# Altium PCB EEM_FMC_Carrier.PcbDoc (part 15 of 19)
Units mm, origin at the board's own origin, x right, y up, seen from the top; angles counter-clockwise.
Board outline 222.9 x 100 mm, 6 copper layers (TopLayer, MidLayer1, MidLayer2, SignalLayer1, Internal Plane 1, BottomLayer), stack 1.528 mm thick; 790 components, 743 nets, 3570 pads, 2277 vias.
Unrouted connection lines stored in the file: 3.
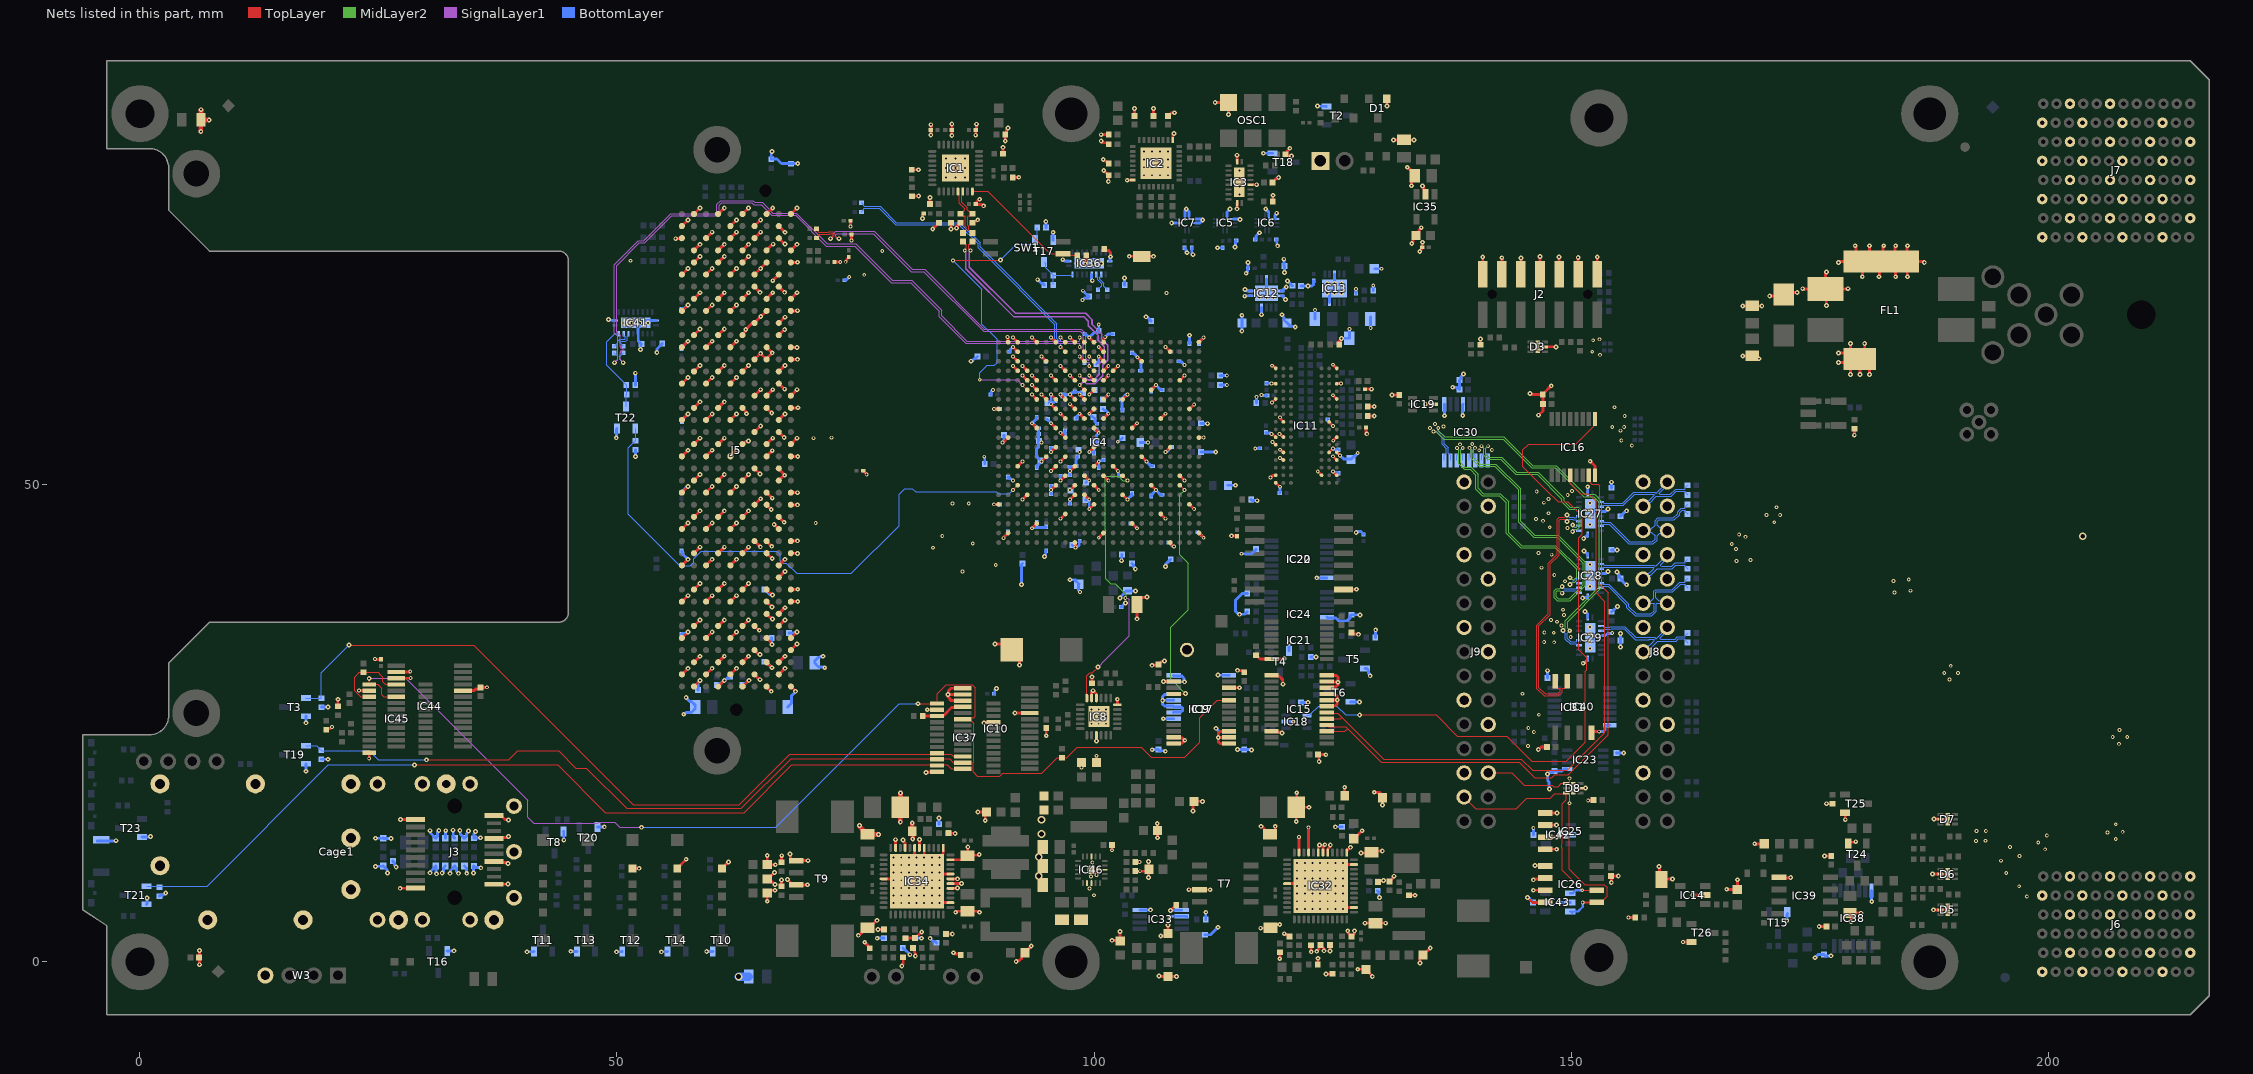
[diagram p17: the nets of this part, all layers, seen from the top]

## Via types
v1: diameter 0.4, hole 0.2, TopLayer to BottomLayer, tented both sides, 1032 vias
v2: diameter 0.5, hole 0.2, TopLayer to BottomLayer, tented both sides, 979 vias
v3: diameter 0.5, hole 0.2, TopLayer to BottomLayer, 162 vias
v4: diameter 0.8, hole 0.5, TopLayer to BottomLayer, tented both sides, 102 vias
v5: diameter 0.6, hole 0.3, TopLayer to BottomLayer, tented both sides, 2 vias

## Nets (pads, with @x,y where several pads share a name; then routed paths per layer and width w, separated by ;. In a path a pad name is that pad's centre, name@x,y a point inside that pad or via, vN(x,y) a via of type N, cw(c..) or ccw(c..) an arc to the next point about the centre after c; other vN are vias at no path point) (continued)
GND: (continued)
  BottomLayer w0.3: SW2.2@-4.475,12.675 -2.55,12.675 v2(-2.525,12.7) ; T23.2@0.225,13.075 0.25,13.1 1.075,13.1 v2(1.1,13.125) ; T21.2@0.7,6.025 0.725,6.05 v2(0.725,6.7) ; R255.1@2.025,6.88 2.165,7.02 2.466,7.02 2.646,7.2 v2(2.7,7.2) ; v2(17.398,19.975) T19.2@17.398,20.75 ; v2(17.398,25.05) T3.2@17.398,25.75 ; R227.1@18.998,21.23 v2(19.703,21.23) ; R45.1@19.025,26.705 v2(19.72,26.705) ; v2(24.675,10) 24.695,10.02 25.48,10.02 C192.1@25.5,10.04 25.505,10.04 25.912,9.633 25.912,9.338 v2(25.95,9.3) ; v2(24.675,12.95) 24.68,12.955 25.495,12.955 C42.1@25.5,12.96 25.517,12.943 26.307,12.943 v2(26.325,12.925) ; C299.2@26.5,10.55 26.66,10.39 26.66,10.169 26.85,9.979 v2(26.85,9.925) ; v2(30.4,9.325) 30.438,9.363 30.438,9.483 30.995,10.04 C19.1@31,10.04 31.038,10.002 31.038,9.262 v2(31.075,9.225) ; v2(30.4,13.75) 30.438,13.712 30.438,13.517 30.995,12.96 C301.1@31,12.96 31.19,13.15 31.19,13.586 31.325,13.721 v2(31.325,13.775) ; v2(31.675,9.3) 31.675,9.354 31.81,9.489 31.81,9.85 C17.1@32,10.04 ; C302.1@32,12.96 32.025,12.985 32.025,13.725 v2(32.05,13.75) ; T16.2@32.2,1.15 v2(32.925,1.15) ; v2(32.5,9.275) 32.538,9.313 32.538,9.583 32.995,10.04 C14.1@33,10.04 33.19,9.85 33.19,9.499 33.4,9.289 v2(33.4,9.275) ; v2(32.8,13.8) 32.838,13.762 32.838,13.122 C303.1@33,12.96 ; v2(33.525,13.775) 33.563,13.737 33.563,13.392 33.995,12.96 C321.1@34,12.96 34.005,12.96 34.21,13.165 34.21,13.456 34.425,13.671 v2(34.425,13.725) ; C18.1@34,10.04 34.005,10.04 34.21,9.835 34.21,9.369 34.25,9.329 v2(34.25,9.275) ; v2(34.95,9.3) 34.975,9.325 34.975,10.025 C20.2@35,10.05 35.16,9.89 35.631,9.89 35.671,9.85 v2(35.725,9.85) ; v2(35.175,13.65) 35.175,13.596 35,13.421 C322.2@35,12.95 35.025,12.975 35.675,12.975 v2(35.7,13) ; v2(40.575,1.05) 41.25,1.05 T11.2@41.3,1.1 ; T8.2@44.4,13.675 44.412,13.662 44.412,12.762 v2(44.425,12.75) ; v2(45.15,1.1) T13.2@45.8,1.1 ; T20.2@47.95,14.15 v2(48.675,14.15) ; v2(49.1,67.325) 49.154,67.325 49.229,67.25 49.775,67.25 IC41.11@49.8,67.225 ; v2(49.925,54.925) 49.963,54.963 49.963,55.863 T22.2@50,55.9 ; v2(49.95,1.05) 50.5,1.05 T12.2@50.55,1.1 ; R118.1@51.92,60.45 51.922,60.453 51.922,61.698 v2(51.925,61.7) ; v2(51.95,52.975) R284.1@51.95,53.68 ; v2(52.45,64.175) 52.488,64.213 52.488,64.713 C300.1@52.55,64.775 52.225,65.1 52.225,65.8 IC41.5@52.2,65.825 52.2,66.725 IC41.21@51.95,66.975 52.2,67.225 IC41.20@54.1,67.225 ; v2(54.172,63.866) 54.21,63.904 54.21,64.245 54.745,64.78 R117.2@54.745,64.8 ; v2(54.65,1.05) 55.25,1.05 T14.2@55.3,1.1 ; C297.1@56.773,34.35 56.773,34.372 56.823,34.422 57.236,34.422 57.384,34.57 v2(57.438,34.57) ; C296.1@56.773,43.075 56.823,43.025 56.823,42.805 v2(57.438,42.19) ; C291.1@56.773,49.225 56.773,49.25 56.823,49.3 56.848,49.3 57.32,49.772 57.4,49.772 v2(57.438,49.81) ; C292.1@56.773,64.225 56.823,64.275 56.823,64.435 v2(57.438,65.05) ; C294.1@56.773,68.4 56.773,68.425 56.823,68.475 57.053,68.475 v2(57.438,68.86) ; C295.1@56.798,56.575 56.848,56.625 56.848,56.84 v2(57.438,57.43) ; v2(56.998,25.95) 57.052,25.95 57.252,26.15 57.622,26.15 57.798,26.15 58.198,26.55 C197.2@58.198,26.725 58.198,26.9 57.798,27.3 57.623,27.3 57.248,27.675 v2(57.248,27.7) ; C198.2@58.473,28.5 58.473,29.222 58.708,29.457 v2(58.708,29.49) ; v2(59.4,1.075) 60.025,1.075 T10.2@60.05,1.1 ; C206.1@60.498,29 60.658,29.16 60.864,29.16 v2@61.194,29.49 ; v2@61.302,29.49 61.552,29.74 61.713,29.74 C195.1@61.873,29.9 ; C196.1@63.173,29 63.333,29.16 63.43,29.16 v2@63.772,29.502 ; C207.1@65.448,31.45 65.608,31.29 65.783,31.29 v2(66.248,30.825) ; C203.1@65.448,39.025 65.985,38.488 v2@66.26,38.488 ; R259.1@66.173,84.145 66.173,84.875 v2(66.248,84.95) ; C209.2@66.198,33.95 66.223,33.925 v2@66.223,33.3 ; R259.1@66.287,84.161 66.757,84.161 67.088,83.83 67.088,83.81 67.228,83.67 R124.1@68.248,83.67 v2(68.943,83.67) ; C208.2@67.898,26.7 68.298,27.1 68.298,27.896 v2@68.698,28.296 ; C205.2@68.048,34.475 68.719,34.475 v2@68.814,34.57 ; v2(71.598,32.025) 71.56,31.987 71.36,31.987 71.298,31.925 71.123,31.925 70.723,31.525 C204.2@70.723,31.35 70.723,31.309 71.123,30.909 71.635,30.909 71.719,30.825 v2(71.773,30.825) ; C194.1@73.848,71.45 73.898,71.5 74.073,71.5 v1(74.348,71.775) ; v2(77.273,2.475) 77.276,2.478 77.996,2.478 R221.1@77.998,2.48 ; R244.1@79.968,1.45 79.968,1.43 80.108,1.29 80.158,1.29 v2(80.698,0.75) ; C284.1@81.248,2.5 81.261,2.488 81.91,2.488 v2(81.923,2.475) ; v2(82.826,2.461) 82.826,2.447 83.153,2.12 83.358,2.12 R231.1@83.498,1.98 ; R235.1@83.748,14.42 v2(83.748,15.075) ; v2(87.098,62.958) 87.136,62.996 87.244,62.996 87.538,63.29 87.638,63.29 C130.1@87.798,63.45 ; v1(88.498,52.95) 88.498,52.923 88.548,52.873 C131.1@88.548,52.2 ; C127.1@89.148,59.45 89.173,59.45 89.223,59.5 89.223,59.748 89.398,59.923 v1(89.398,59.95) ; v1(89.498,47.956) 89.504,47.95 C64.1@90.148,47.95 ; v1(89.498,57.95) C122.1@90.148,57.95 ; C111.1@89.525,28.1 89.55,28.1 89.6,28.15 89.6,28.471 v2@89.779,28.65 ; v1(90.423,54.425) 90.423,54.452 90.548,54.577 C121.1@90.548,55.2 ; v1(90.498,44.407) 90.517,44.426 90.517,44.469 90.948,44.9 90.948,45.05 C141.1@90.998,45.1 ; C133.1@91.048,50.85 C133.1@90.998,50.8 90.998,50.775 91.048,50.725 91.196,50.725 v1@91.471,50.45 ; C168.1@91.148,63.95 91.173,63.95 91.223,64 91.223,64.175 v1(91.498,64.45) ; v2(92.4,39.556) 92.4,41.652 C116.1@92.498,41.75 ; v1(93.498,45.45) 93.525,45.45 93.6,45.525 94.948,45.525 94.998,45.575 C65.1@94.998,45.6 ; 93.998,45.6 C144.1@93.998,46.1 ; C132.1@93.998,51.8 94.048,51.85 94.048,52 v1(94.498,52.45) 93.98,52.968 93.98,53.741 94.163,53.924 94.163,55.935 93.667,56.431 93.517,56.431 v1(93.498,56.45) 93.948,56.9 93.948,57.05 C143.1@93.998,57.1 ; v2(94.098,71.5) 94.488,71.11 94.638,71.11 94.778,70.97 R252.1@94.778,70.95 ; v1(94.498,63.45) 94.948,63 94.948,62.85 C172.1@94.998,62.8 ; v2(94.798,42.475) 94.798,42.529 94.948,42.679 94.948,43.05 C123.1@94.998,43.1 ; v2(94.948,77.6) 94.958,77.59 94.958,76.96 R253.1@94.968,76.95 ; C315.1@95.1,56.848 v1@95.479,56.469 ; v1(95.498,53.45) 95.504,53.456 95.504,53.893 C150.1@95.51,53.899 ; v1(95.498,58.45) 95.479,58.469 95.41,58.469 95.324,58.555 C312.1@95.324,58.624 ; v1(95.498,59.45) 95.517,59.431 95.517,58.8 95.5,58.8 C312.1@95.324,58.624 ; C316.1@95.5,49.925 95.5,49.452 v1(95.498,49.45) 95.517,49.431 95.517,49.058 C319.1@95.55,49.025 ; T17.2@95.715,75.635 95.719,75.639 95.719,76.471 v2(95.723,76.475) ; C152.1@95.998,58.8 95.998,58.775 95.948,58.725 95.923,58.725 95.822,58.624 C312.1@95.324,58.624 ; C151.1@96.489,50.952 96.493,50.948 96.493,50.455 v1(96.498,50.451) ; v1(96.498,55.45) 96.517,55.431 96.944,55.431 ; v2(96.723,73.6) 96.777,73.6 96.927,73.45 IC36.11@97.348,73.45 ; C308.1@96.725,59.45 v1(97.498,59.45) 97.525,59.45 97.775,59.7 97.925,59.7 C146.1@97.975,59.75 ; C317.1@96.952,55.138 96.944,55.146 96.944,55.431 ; C149.1@96.952,55.682 96.944,55.674 96.944,55.431 ; C318.1@97.45,51.9 97.479,51.871 97.479,51.469 v1(97.498,51.45) 97.494,51.446 97.494,51.007 C148.1@97.491,51.003 ; v2(97.473,40.05) 98.048,40.05 98.073,40.025 98.073,39.95 L4.1@98.423,39.6 98.365,39.542 98.365,38.908 v1(98.523,38.75) ; C147.1@97.491,48.006 97.494,48.01 97.494,48.446 v1(97.498,48.45) ; C318.1@97.5,51.95 R83.1@98.148,51.95 ; C309.1@97.725,43.7 97.986,43.439 98.029,43.439 v1(98.048,43.42) 98.067,43.439 98.182,43.439 98.448,43.705 98.448,44.05 C118.1@98.498,44.1 ; C146.1@97.975,59.775 C146.1@97.975,59.75 ; C112.1@98.148,56.95 98.173,56.95 98.223,57 98.223,57.224 98.43,57.431 98.479,57.431 v1(98.498,57.45) ; R83.1@98.168,51.95 R83.1@98.148,51.95 ; R84.1@98.303,52.95 98.283,52.95 98.223,52.89 98.223,52.722 98.108,52.607 98.108,52.027 98.148,51.987 R83.1@98.148,51.95 ; v1(98.498,63.45) 98.948,63 98.948,62.85 C170.1@98.998,62.8 ; C313.1@98.7,59.6 98.55,59.45 98.55,59.69 98.54,59.7 98.025,59.7 C146.1@97.975,59.75 ; v1(98.798,69.375) 98.809,69.375 99.024,69.59 99.338,69.59 C287.1@99.498,69.75 99.338,69.91 99.265,69.91 v1(98.825,70.35) ; C169.1@98.998,65.8 98.998,65.775 99.048,65.725 99.223,65.725 v1(99.498,65.45) 100.038,65.99 100.338,65.99 C156.1@100.498,66.15 v1(100.498,66.819) ; C105.1@99.125,48.4 99.498,48.4 v1@99.498,47.472 ; C109.1@99.15,50.25 99.31,50.41 99.431,50.41 99.471,50.45 v1(99.498,50.45) ; v1(99.498,53.45) v1@99.525,53.45 ; v1(99.498,57.45) 99.838,57.11 99.888,57.11 100.048,56.95 100.075,56.95 100.11,56.915 100.11,56.615 C161.1@100.325,56.4 ; v1(99.498,59.45) 99.838,59.79 99.888,59.79 C163.1@100.048,59.95 ; v1(99.498,61.45) 99.948,61 100.098,61 C102.1@100.148,60.95 ; IC36.5@99.748,72.05 99.748,71.529 99.823,71.454 v2(99.823,71.4) ; C113.1@99.948,53.45 v1@99.525,53.45 ; C113.1@99.998,53.3 C113.1@99.998,53.325 ; C320.1@100.225,55.85 100.25,55.85 100.479,55.621 100.479,55.469 v1(100.498,55.45) 100.247,55.199 100.247,54.499 C153.1@100.198,54.45 99.998,54.25 C113.1@99.998,53.325 ; C99.1@100.248,62.65 100.498,62.9 v1(100.498,63.45) ; C157.1@100.498,51.798 v1(100.498,52.45) 100.525,52.45 100.6,52.525 100.948,52.525 100.998,52.575 C158.1@100.998,52.6 ; C106.1@100.948,57.95 101.108,57.79 101.272,57.79 101.479,57.583 101.479,57.469 v1(101.498,57.45) ; C104.1@100.948,58.95 101.108,59.11 101.158,59.11 v1(101.498,59.45) ; v1(101.173,65.475) 101.498,65.8 C129.1@101.998,65.8 ; IC36.20@101.648,73.45 101.66,73.45 101.685,73.475 101.685,73.863 v2(101.722,73.9) ; v1(102.487,54.518) 102.506,54.537 102.56,54.537 102.763,54.74 102.838,54.74 C178.1@102.998,54.9 ; v1(102.498,51.45) 102.498,51.423 102.573,51.348 102.573,51 102.623,50.95 C160.1@102.648,50.95 ; v2(102.725,38.125) 102.763,38.163 102.763,38.24 103.423,38.9 C164.1@103.498,38.9 103.51,38.888 104.336,38.888 v2(104.348,38.875) ; C173.1@102.848,37.2 102.873,37.2 102.923,37.25 102.923,37.275 103.207,37.559 103.265,37.559 v2(103.304,37.597) ; C159.1@102.848,58.95 C159.1@102.873,58.95 ; v2(102.873,42.05) 102.91,42.087 102.91,42.663 C162.1@102.948,42.7 ; C138.1@102.998,57.8 102.948,57.85 102.948,58.04 102.937,58.051 102.937,58.632 102.923,58.646 102.923,58.9 C159.1@102.873,58.95 ; v2(103.198,71.675) 103.208,71.665 103.208,70.96 R254.2@103.218,70.95 ; v1(103.498,48.45) 103.948,48.9 103.948,49.05 C288.1@103.998,49.1 ; v1(103.498,59.45) 103.479,59.431 103.329,59.431 102.923,59.025 102.923,59 C159.1@102.873,58.95 ; C134.1@103.848,45.95 103.898,45.9 104.048,45.9 v1(104.498,45.45) ; C45.1@103.974,63.811 103.974,63.786 104.024,63.736 104.212,63.736 v1(104.573,63.375) 104.937,63.011 104.937,62.268 104.923,62.254 104.923,62 104.873,61.95 C128.1@104.848,61.95 ; C120.1@103.998,41.75 104.158,41.59 104.158,41.397 104.333,41.222 v2(104.333,41.177) ; IC33.4@104.81,5.438 v2@105.911,5.438 ; C101.1@104.848,54.45 v1(105.648,54.45) ; v2(105.452,67.609) 105.506,67.609 105.611,67.504 105.644,67.504 C125.1@105.998,67.15 ; v1(105.496,52.458) 105.496,52.452 105.948,52 106.098,52 C183.1@106.148,51.95 ; C119.1@105.998,48.8 106.048,48.85 106.048,49 v1(106.498,49.45) 106.948,49 107.098,49 C289.1@107.148,48.95 ; C139.1@105.998,59.8 106.048,59.85 106.048,60 v1(106.498,60.45) 106.948,60 107.098,60 C137.1@107.148,59.95 ; v2(106.098,22.225) 106.111,22.238 106.735,22.238 C67.1@106.748,22.25 106.872,22.126 107.368,22.126 107.419,22.075 v2(107.473,22.075) ; v2(107.259,25.475) IC17.5@108.348,25.475 ; v2(107.49,41.45) 107.529,41.488 107.529,41.681 C177.1@108.048,42.2 ; v1(107.499,53.449) 107.518,53.468 107.641,53.468 108.073,53.9 108.098,53.9 C140.1@108.148,53.95 ; C117.1@107.848,43.95 107.873,43.95 107.923,43.9 107.923,43.832 108.21,43.544 108.354,43.544 v1(108.373,43.525) ; v2(108.025,5.375) 108.05,5.4 IC33.5@109.173,5.4 ; v2@108.077,4.775 IC33.6@109.198,4.775 ; v2(108.143,77.45) IC7.9@108.848,77.45 ; IC17.6@108.348,26.125 108.423,26.2 109.122,26.2 109.298,26.376 109.298,26.575 109.173,26.7 108.423,26.7 IC17.7@108.348,26.775 108.305,26.818 107.38,26.818 107.198,27 v2(107.198,27.4) ; IC17.8@108.348,27.425 108.335,27.413 107.211,27.413 v2(107.198,27.4) ; IC17.9@108.348,28.075 108.28,28.007 107.405,28.007 107.198,27.8 v2(107.198,27.4) ; IC17.11@108.348,29.375 108.36,29.363 v2@109.46,29.363 ; IC17.12@108.348,30.025 108.423,29.95 109.198,29.95 109.347,29.801 109.441,29.707 109.441,29.382 v2@109.46,29.363 ; C142.1@108.848,62.95 108.898,62.9 109.148,62.9 v1(109.498,62.55) ; v2@109.473,29.296 v2(109.473,29.35) v2@109.46,29.363 ; C51.1@109.498,74.85 109.548,74.8 109.548,74.775 109.648,74.675 109.648,74.479 109.748,74.379 v2(109.748,74.325) ; IC7.1@109.548,78.1 109.548,78.775 v2(109.673,78.9) 109.948,78.624 IC7.2@109.948,78.15 ; IC33.6@109.72,4.7 109.645,4.775 IC33.6@109.198,4.775 ; IC33.6@109.72,4.775 IC33.6@109.198,4.775 ; C41.1@109.998,64.8 v2(109.998,65.675) ; C48.1@110.248,74.85 110.249,74.849 110.249,74.303 110.373,74.179 v2(110.373,74.125) ; IC7.4@110.648,77.45 111.122,77.45 111.398,77.726 v2(111.398,77.75) 111.298,77.85 IC7.3@110.648,77.85 ; C182.1@110.848,45.025 110.898,44.975 110.973,44.975 v1(111.498,44.45) ; C124.1@110.998,64.8 111.048,64.85 111.048,65 v1(111.498,65.45) ; C136.1@111.198,53.45 112.741,53.45 v2(112.761,53.43) ; C135.1@111.198,56.45 111.218,56.43 111.88,56.43 v2(111.9,56.41) ; C245.1@111.633,2.835 111.642,2.844 112.217,2.844 v2(112.998,3.625) ; R194.1@111.718,4.45 111.718,5.193 v2(111.725,5.2) ; v2(112.798,24.475) 113.098,24.175 IC17.22@114.148,24.175 ; v2(112.948,74.85) C49.1@113.498,74.85 ; v2(112.998,30.05) 113.011,30.038 114.135,30.038 IC17.13@114.148,30.025 ; C126.1@113.198,60.45 v1(113.923,60.45) ; C115.1@113.198,61.45 v1(113.923,61.45) ; IC5.2@113.948,78.15 113.948,78.6 v2(114.248,78.9) ; C175.1@114.048,49.95 v2(114.823,49.95) ; IC5.3@114.648,77.85 115.26,77.85 v2(115.296,77.814) v2@115.332,77.85 ; v2(114.773,74.939) 114.773,74.993 114.823,75.043 114.823,75.55 114.873,75.6 C46.1@114.898,75.6 ; v2(115.048,22.25) C66.1@115.748,22.25 116.448,22.25 v2(116.498,22.2) ; v1(115.448,42.775) 116.523,42.775 C191.1@116.998,43.25 ; v2(115.498,66.125) C90.1@115.498,66.95 v2(115.498,67.775) ; v2(115.798,69.775) 115.852,69.775 115.9,69.823 IC12.11@116.52,69.823 ; v2(115.823,70.475) 115.877,70.475 116.029,70.323 IC12.11@116.52,70.323 ; v2(115.948,72.175) 115.948,72.229 116.073,72.354 116.073,72.65 116.123,72.7 C93.1@116.148,72.7 v2(116.148,73.3) ; R104.2@116.055,36.7 116.055,36.68 115.84,36.465 115.792,36.465 115.752,36.425 115.175,36.425 114.813,36.787 114.813,37.863 115.575,38.625 R110.2@116.08,38.625 ; R36.1@116.468,48.475 116.569,48.374 117.067,48.374 v2(117.106,48.336) ; v1(116.898,53.8) 116.911,53.813 117.386,53.813 C86.1@117.398,53.825 ; C50.1@116.898,75.7 116.916,75.7 116.966,75.75 116.966,76.093 117.298,76.425 v2(117.337,76.425) v2@117.337,76.461 ; v1(117.023,59.225) 117.026,59.223 117.026,58.578 R68.1@117.028,58.575 ; v1(117.548,59.4) 117.567,59.381 117.673,59.381 117.704,59.35 118.098,59.35 118.123,59.375 C78.1@118.148,59.375 ; v2@117.57,67.847 IC12.4@117.57,68.573 ; v2(117.748,84.75) T18.2@118.723,84.75 ; v2(117.998,78.896) 118.323,78.571 IC6.2@118.323,78.15 ; C81.1@118.023,55.5 118.023,55.475 118.073,55.425 118.491,55.425 118.591,55.325 v1(118.618,55.325) ; IC12.11@118.07,70.073 IC12.8@118.07,71.573 ; C80.1@118.073,60.65 118.082,60.641 118.589,60.641 v1(118.598,60.632) ; IC6.3@119.023,77.85 118.973,77.85 118.973,78.246 119.148,78.421 v2(119.148,78.475) ; C47.1@119.098,75.7 C47.1@119.098,75.7 119.149,75.65 119.149,75.203 119.248,75.104 v2(119.248,75.05) ; C82.1@119.473,49.125 119.486,49.138 119.486,49.788 v1(119.498,49.8) ; IC12.11@119.62,69.823 119.81,69.823 119.82,69.813 119.82,69.718 120.066,69.472 v2(120.066,69.418) ; IC12.11@119.62,70.323 119.81,70.323 119.82,70.333 119.82,70.439 120.106,70.725 v2(120.148,70.725) ; v2(119.698,67.825) 119.698,67.774 119.923,67.549 119.923,67.275 C91.1@120.248,66.95 120.573,66.625 120.969,66.625 121.044,66.55 v2(121.098,66.55) ; v2(119.898,73.65) 119.923,73.625 119.923,72.975 C88.1@119.948,72.95 119.96,72.937 119.96,72.263 v2(119.973,72.25) ; IC18.2@120.123,25.175 120.129,25.169 120.878,25.169 v2(120.884,25.163) ; v2(120.273,71.35) 120.313,71.35 120.635,71.028 120.635,71.008 120.775,70.868 R72.1@120.795,70.868 ; T4.2@120.448,32.6 v2(120.448,33.427) ; C92.1@121.695,70.848 121.697,70.85 v2(122.423,70.85) 122.856,70.85 123.025,71.019 C305.1@123.025,71.394 ; C181.1@121.698,27.2 121.711,27.187 122.411,27.187 v2(122.424,27.173) ; R115.1@122.718,31.95 v2(123.275,31.95) ; C304.1@123.15,67.394 v1(123.15,68.344) ; v2(123.348,40.25) IC20.7@124.398,40.25 ; v2(123.423,89.7) 123.448,89.675 124.323,89.675 T2.2@124.348,89.65 ; IC24.13@124.436,36.125 124.511,36.05 125.35,36.05 125.65,35.75 126.549,35.75 126.815,36.016 126.815,36.215 C190.1@126.975,36.375 127.864,36.375 v2(127.895,36.345) ; C87.1@124.498,56.85 124.523,56.85 124.573,56.8 124.573,56.65 v1(125.048,56.175) ; IC13.4@124.7,69.094 124.7,70.094 IC13.11@125.2,70.594 v2(125.2,71.102) IC13.8@125.2,72.094 ; v1(125.048,53.8) 125.075,53.8 125.159,53.716 125.582,53.716 C85.1@125.623,53.675 ; v1@125.078,51.385 125.191,51.273 125.573,51.273 125.623,51.223 C83.1@125.623,51.2 ; v2@125.308,14.16 R204.1@125.988,14.16 ; v1(125.798,53.075) 126.174,52.699 126.899,52.699 C89.1@126.923,52.675 127.248,53 127.323,53 v1(127.648,53.325) ; v2(125.95,65.344) 125.975,65.369 C96.1@126.775,65.369 v1(126.775,66.344) ; T6.2@126.898,27.25 126.91,27.238 127.811,27.238 v2(127.823,27.225) ; C95.1@127.45,70.044 v1(127.45,70.529) ; v2(127.477,44.993) 127.531,44.993 127.638,45.099 127.974,45.099 128.248,44.825 C189.1@128.248,44.8 ; T5.2@128.398,30.75 128.6,30.75 128.75,30.6 128.75,30.3 128.91,30.14 128.91,30.013 v2(128.949,29.975) ; v1(129,66.444) 129,67.575 C44.1@129.01,67.584 ; R75.1@129.27,70.369 129.27,70.864 129.275,70.869 v1(129.275,70.894) ; C94.1@129.448,72.644 v1(130.124,72.644) ; R116.1@129.495,34 129.495,34.768 v2(129.527,34.8) ; R210.1@129.718,7.45 129.849,7.319 129.849,6.857 129.913,6.793 v2(129.913,6.739) ; IC30.9@136.723,58.45 136.723,57.249 v2(136.732,57.24) ; v2(137.598,60.225) 137.962,60.225 138.027,60.16 138.138,60.16 C221.1@138.298,60 C222.1@138.298,61 138.458,61.16 138.458,61.36 v2(138.723,61.625) ; v2@138.598,57.3 138.635,57.337 138.635,58.413 IC30.12@138.673,58.45 ; v2(145.45,6.75) 145.488,6.712 145.57,6.712 145.865,6.416 145.865,6.36 146,6.225 C307.1@146.056,6.225 ; v2(145.698,59.575) v2@145.736,59.613 ; C306.1@146.05,13.275 v1(146.05,14.025) ; v2@146.213,10.112 v2(146.225,10.1) ; v2(147.54,30.521) 147.54,29.76 C298.1@147.55,29.75 ; v2(147.731,18.102) 147.702,18.132 147.702,18.848 147.563,18.987 147.563,19.638 v2(147.526,19.675) 147.58,19.675 147.745,19.84 148.088,19.84 C187.1@148.248,20 149.023,20 149.248,20.225 IC23.1@149.598,20.225 ; v2(148.488,13.065) 148.504,13.065 148.764,13.325 IC42.2@149.95,13.325 ; v1(148.75,6.175) 148.777,6.175 148.827,6.225 IC43.2@149.925,6.225 ; v2@151.167,38.075 v2(151.22,38.128) 151.258,38.166 151.364,38.166 151.375,38.177 151.723,38.177 151.748,38.202 IC28.11@151.748,38.3 ; v2(151.273,31.293) 151.311,31.331 151.404,31.331 151.748,31.675 IC29.11@151.748,31.8 ; v2(151.323,44.375) 151.598,44.65 151.723,44.65 151.748,44.675 IC27.11@151.748,44.8 ; v2@151.374,43.05 151.674,42.75 151.723,42.75 151.748,42.725 IC28.20@151.748,42.6 ; v2(151.473,36.725) 151.748,36.45 IC29.20@151.748,36.1 ; IC27.20@151.748,49.1 v2(151.748,49.8) ; v1(152.95,24.125) 153.388,24.125 153.563,24.301 153.563,24.721 153.638,24.796 IC40.7@154.054,24.796 ; IC29.5@153.148,34.2 153.623,34.2 153.848,34.425 154.229,34.425 154.235,34.431 154.306,34.431 v1(154.325,34.45) ; IC28.5@153.148,40.7 153.648,40.7 v2(153.873,40.925) ; IC27.5@153.148,47.2 153.623,47.2 v2(153.873,47.45) ; R183.2@154.248,36.67 154.388,36.81 154.435,36.81 v2(154.875,37.25) ; R182.2@154.248,43.17 v2(154.826,43.17) v2@154.918,43.17 ; R181.2@154.248,49.67 v2(154.248,50.275) ; C186.1@154.773,21.875 154.798,21.9 v2(155.525,21.9) ; v2(154.823,40.85) 155.038,40.635 155.038,40.36 C223.1@155.198,40.2 155.358,40.04 155.358,39.94 155.673,39.625 155.678,39.625 155.778,39.525 v2(155.832,39.525) v2@155.807,39.5 ; v2(155.198,33) C225.1@155.198,33.7 v2(155.198,34.4) ; C224.1@155.198,46.7 155.358,46.86 155.673,47.175 155.678,47.175 155.778,47.275 v2(155.832,47.275) ; v2(172.625,4.3) 172.625,4.851 T15.2@172.69,5.06 ; v2(175.575,0.425) 175.916,0.766 176.491,0.766 C167.1@176.5,0.775 176.66,0.615 177.24,0.615 v2(177.25,0.625) ; IC38.7@181.498,7.475 181.5,7.473 181.5,6.35 v2(181.525,6.325) ; v1@99.525,53.45 99.544,53.431 99.892,53.431 C113.1@99.998,53.325
  BottomLayer w0.9: v4(62.748,-1.55) R119.2@63.798,-1.55
  other v1: 197.775,6.85 100,6.975 99.525,7.675 196.977,7.922 99.7,8.95 195.625,9.3 99.825,10.4 195.081,10.6 197,11.094 199.7,11.794 196.025,12.044 198.975,12.5 192.452,12.675 193.452,12.694 207.1,12.875 199.875,13.244 206.25,13.544 207.825,13.625 192.502,13.7 193.478,13.717 207.1,14.419 145.5,22.627 207.45,22.85 206.775,23.55 208.3,23.55 146.1,24.1 207.497,24.297 145.525,24.5 146.625,25.9 144.9,28.1 189.675,29.594 189.125,30.275 190.55,30.269 189.8,31.025 148.235,33.49 147.185,33.515 149.963,34.044 148.185,34.49 147.2,34.525 149,35.244 148.53,35.65 147.91,35.815 149.26,36.34 149.175,36.9 183.9,38.7 185.6,38.9 149.375,39.894 183.8,39.925 185.4,40.075 148.25,40.55 86.2,40.9 146.91,41.315 89.7,41.6 167.35,42 168.8,42.125 147.975,42.675 146.585,42.865 167.3,43.275 83.125,43.4 166.85,43.8 87.291,43.852 168.275,44.55 84.099,44.619 167.625,44.775 149.625,45.469 147.775,45.55 70.825,46 171.3,46.075 147.05,46.225 146.325,46.4 170.5,46.825 171.925,46.85 147.634,47.015 171.525,47.65 86.875,48.025 85.175,48.05 147.15,48.125 147.625,48.5 149.65,48.925 146.4,49.3 150.1,49.35 91.498,50.45 98.498,53.45 140.375,53.619 141.7,53.644 156.375,54.125 138.35,54.244 139.65,54.267 94.498,54.45 155.275,54.65 70.612,54.889 72.492,54.94 155.2,55.675 135.225,55.95 154.325,56.075 155.575,56.075 136.625,56.1 135.75,56.375 155.625,57.225 154.548,58.129 153.025,63.625 152.225,63.95 152.325,65.15 152.975,65.25 107.594,70.104 75.921,72.009 51.41,73.482 77.8,74.5
  other v2: 107.973,4.725 105.923,5.45 125.298,14.15 176.775,16.575 89.779,28.651 127.722,34.325 115.257,36.425 127.525,39.05 151.373,43.05 138.65,57.275 148.423,64.45 117.559,67.836 124.438,70.086 125.2,70.086 125.962,70.086 124.438,71.102 125.962,71.102 92.122,82.243
  other v3: 121.298,5.55 122.098,5.55 122.898,5.55 123.698,5.55 124.498,5.55 125.298,5.55 126.098,5.55 78.998,6.15 79.798,6.15 80.598,6.15 81.398,6.15 82.198,6.15 82.998,6.15 83.798,6.15 121.298,6.35 122.098,6.35 122.898,6.35 123.698,6.35 124.498,6.35 125.298,6.35 126.098,6.35 78.998,6.95 79.798,6.95 80.598,6.95 81.398,6.95 82.198,6.95 82.998,6.95 83.798,6.95 121.298,7.15 122.098,7.15 122.898,7.15 123.698,7.15 124.498,7.15 125.298,7.15 126.098,7.15 78.998,7.75 79.798,7.75 80.598,7.75 81.398,7.75 82.198,7.75 82.998,7.75 83.798,7.75 121.298,7.95 122.098,7.95 122.898,7.95 123.698,7.95 124.498,7.95 125.298,7.95 126.098,7.95 78.998,8.55 79.798,8.55 80.598,8.55 81.398,8.55 82.198,8.55 82.998,8.55 83.798,8.55 121.298,8.75 122.098,8.75 122.898,8.75 123.698,8.75 124.498,8.75 125.298,8.75 126.098,8.75 78.998,9.35 79.798,9.35 80.598,9.35 81.398,9.35 82.198,9.35 82.998,9.35 121.298,9.55 122.098,9.55 122.898,9.55 123.698,9.55 124.498,9.55 125.298,9.55 126.098,9.55 78.998,10.15 79.798,10.15 80.598,10.15 81.398,10.15 82.198,10.15 82.998,10.15 83.798,10.15 121.298,10.35 122.098,10.35 122.898,10.35 123.698,10.35 124.498,10.35 125.298,10.35 126.098,10.35 78.998,10.95 79.798,10.95 80.598,10.95 81.398,10.95 82.198,10.95 82.998,10.95 99.748,24.95 100.498,24.95 101.248,24.95 99.748,25.7 100.498,25.7 101.248,25.7 99.748,26.45 100.498,26.45 101.248,26.45 151.998,32.825 151.998,33.575 151.998,34.35 151.998,35.1 151.998,39.35 151.998,40.125 151.998,40.925 151.998,41.65 151.998,45.825 151.998,46.6 151.998,47.35 151.998,48.075 50.675,66.975 51.533,66.975 52.392,66.975 53.25,66.975 117.323,69.65 118.098,69.65 118.798,69.65 117.323,70.45 118.098,70.45 118.798,70.45 98.223,73.2 99.94,73.2 100.798,73.2 115.248,80.45 115.248,81.283 115.248,82.117 84.498,82.2 85.498,82.2 86.498,82.2 105.248,82.45 106.081,82.45 106.915,82.45 107.748,82.45 115.248,82.95 84.498,83.2 85.498,83.2 86.498,83.2 105.248,83.283 106.081,83.283 106.915,83.283 107.748,83.283 105.248,84.117 106.081,84.117 106.915,84.117 107.748,84.117 84.498,84.2 85.498,84.2 86.498,84.2 105.248,84.95 106.081,84.95 106.915,84.95 107.748,84.95
  other v4: 94.2,9 94.2,11 94.5,13.4 94.5,14.9 203.65,44.6
GPIO_INT: IC9.20 IC10.20 IC37.1 IC44.20 IC45.1 R19.1 | length 126
  TopLayer w0.125: v2(24.025,29.7) IC45.1@24.025,29.075 24.925,29.075 25.35,28.65 25.35,28 25.575,27.775 IC44.20@26.853,27.775 ; v2(81.55,27.05) 83.525,27.05 IC37.1@83.55,27.075 83.55,28.1 84.501,29.051 87.236,29.051 87.55,28.737 87.55,25.725 87.399,25.574 86.397,25.574 IC10.20@86.248,25.425 86.948,25.425 87.222,25.151 87.236,25.151 87.4,24.987 87.4,20.975 87.324,20.899 87.324,19.901 87.775,19.45 90.139,19.45 90.448,19.759 94.512,19.759 96.138,21.385 R19.1@96.67,21.385 ; R19.1@96.65,21.385 R19.1@96.67,21.385 ; IC9.20@114.148,27.425 112.898,27.425 111.073,25.6 111.073,23.023 109.51,21.46 105.993,21.46 104.944,22.508 98.265,22.508 97.142,21.385 R19.1@96.67,21.385
  SignalLayer1 w0.125: v2(24.025,29.7) 27.875,29.7 40.625,16.95 40.625,15.15 41.25,14.525 48,14.525 48.1,14.625 49.75,14.625 50.275,14.1 v2(52.575,14.1)
  BottomLayer w0.125: v2(52.575,14.1) 64.875,14.1 64.876,14.099 66.624,14.099 79.575,27.05 v2(81.55,27.05)
GPIO_INT_2V5: IC4.T20 IC9.4 | length 25.3
  TopLayer w0.125: IC9.4@108.348,28.075 108.39,28.117 v2(109.581,28.117) ; IC4.T20@108.998,49.95 v1(109.498,49.45)
  MidLayer2 w0.125: v1(109.498,49.45) 108.998,48.95 108.998,42.675 109.898,41.775 109.898,36.925 108.048,35.075 108.048,29.65 v2(109.581,28.117)
GPIO_RESET0: IC10.18 IC37.3 R37.1 | length 4.6
  TopLayer w0.3: R37.1@82.07,25.775 IC37.3@83.55,25.775 83.625,25.85 84.275,25.85 85.075,26.65 86.173,26.65 IC10.18@86.248,26.725
GPIO_RESET1: IC44.18 IC45.3 R288.1 | length 8.6
  TopLayer w0.127: IC45.3@24.025,27.775 23.126,27.775 22.5,28.401 22.5,29.825 23.005,30.33 24.95,30.33 24.97,30.33 25.196,30.104 25.196,30.084 25.45,29.83 25.45,29.35 25.725,29.075 IC44.18@26.853,29.075
GTP2_SEL: IC4.T3 R284.2 T22.1 | length 60.8
  TopLayer w0.127: v1(91.498,49.45) IC4.T3@91.998,49.95
  BottomLayer w0.127: T22.1@51.9,55.9 51.95,55.85 R284.2@51.95,54.62 51.93,54.62 51.175,53.865 51.175,46.925 56.575,41.525 57.7,41.525 58.05,41.875 58.05,42.25 58.85,43.05 66.75,43.05 67.125,42.675 67.125,42.05 67.388,41.788 67.737,41.788 68.816,40.709 74.559,40.709 79.575,45.725 79.575,49.001 80.162,49.588 80.962,49.588 81.3,49.25 89.775,49.25 89.975,49.05 91.098,49.05 v1(91.498,49.45)
GTP2_SEL_N: IC41.9 R18.1 R118.2 T22.3 | length 9.3
  BottomLayer w0.127: IC41.9@50.2,65.825 49.75,65.825 48.9,64.975 48.9,62.55 50.98,60.47 R118.2@50.98,60.45 51.005,60.425 R18.1@51.005,59.475 50.95,59.42 T22.3@50.95,58.2
GTP3_SEL: IC4.F4 R253.2 T17.1 | length 32.1
  TopLayer w0.125: v1(85.213,73.515) 85.185,73.515 85.168,73.532 90.18,73.532 v2(90.198,73.55) ; v1(92.498,60.45) IC4.F4@92.998,59.95
  SignalLayer1 w0.125: v1(88.023,61.012) 88.498,61.012 91.936,61.012 v1(92.498,60.45)
  BottomLayer w0.125: v1(85.213,73.515) 88.248,70.479 88.248,66.85 89.85,65.248 89.85,62.804 89.56,62.515 88.788,62.515 88.023,61.75 v1(88.023,61.012) ; v2(90.198,73.55) 91.846,75.198 93.578,75.198 93.815,75.435 T17.1@93.815,75.635 94.028,75.848 R253.2@94.028,76.95
GTP3_SEL_N: IC36.9 R251.1 R252.2 T17.3 | length 4.9
  BottomLayer w0.106: T17.3@94.765,73.335 94.93,73.171 94.93,72.738 95.461,72.207 95.481,72.207 95.718,71.97 R251.1@95.718,71.95 ; R252.2@95.718,70.95 R251.1@95.718,71.95 ; IC36.9@97.748,72.05 97.748,72.022 97.676,71.95 R251.1@95.718,71.95
GTP_CLK.CLK_N: C6.2 IC4.E10 | length 28
  TopLayer w0.1: C6.2@86.248,75.5 86.508,75.24 86.564,75.24 86.623,75.181 86.623,74.7 ; v1(86.448,74.55) 86.448,74.593 86.589,74.734 ; v1(98.498,61.45) IC4.E10@98.998,60.95
  SignalLayer1 w0.17: v1(86.448,74.55) 86.448,74.488 86.558,74.378 86.558,72.655 91.613,67.6 98.963,67.6 99.406,67.156 99.406,66.681 100.432,65.656 100.432,65.118 101.075,64.475 101.075,63.2 100.55,62.675 100.55,61.575 99.955,60.98 99.367,60.98 99.207,61.14 98.808,61.14 v1(98.498,61.45)
GTP_CLK.CLK_P: C4.2 IC4.F10 | length 28.6
  TopLayer w0.1: 86.873,74.7 86.873,75.181 86.932,75.24 86.988,75.24 C4.2@87.248,75.5 ; 86.907,74.734 87.048,74.593 v1(87.048,74.55) ; v1(98.498,60.45) IC4.F10@98.998,59.95
  SignalLayer1 w0.17: v1(87.048,74.55) 87.048,74.488 86.938,74.378 86.938,72.812 91.77,67.98 99.12,67.98 99.786,67.314 99.786,66.839 100.812,65.813 100.812,65.275 101.455,64.632 101.455,63.043 100.93,62.518 100.93,61.418 100.112,60.6 99.21,60.6 99.05,60.76 98.808,60.76 v1(98.498,60.45)
GTP_CLK_N: C6.1 IC1.29 R7.1 | length 5.4
  TopLayer w0.1: IC1.29@85.748,80.75 85.748,80.441 85.873,80.316 85.873,79.5 86.444,78.929 86.444,78.846 86.018,78.42 R7.1@85.998,78.42 86.238,78.18 86.439,78.18 86.498,78.121 86.498,77.08 86.623,76.955 86.623,76.719 86.564,76.66 86.508,76.66 C6.1@86.248,76.4
GTP_CLK_P: C4.1 IC1.30 R5.1 | length 5.5
  TopLayer w0.1: IC1.30@86.248,80.75 86.248,80.441 86.123,80.316 86.123,79.604 86.694,79.032 86.694,78.853 86.887,78.66 87.008,78.66 R5.1@87.248,78.42 87.008,78.18 86.807,78.18 86.748,78.121 86.748,77.184 86.873,77.059 86.873,76.719 86.932,76.66 86.988,76.66 C4.1@87.248,76.4
I2C_MUX_RST_N: IC4.R14 IC8.24 | length 29.9
  TopLayer w0.125: IC8.24@99.248,27.65 99.248,30 99.536,30.288 99.814,30.288 v2(100.425,30.9) ; IC4.R14@102.998,50.95 v1(103.498,50.45)
  MidLayer2 w0.125: v1(103.283,38.14) 103.283,38.214 103.372,38.303 103.372,38.349 103.384,38.361 103.384,38.464 102.223,39.625 101.748,39.625 101.223,40.15 101.223,45.246 101.16,45.31 101.16,50.738 101.296,50.875 102.598,50.875 103.023,50.45 v1(103.498,50.45)
  SignalLayer1 w0.125: v2(100.425,30.9) 100.425,30.902 101.173,31.65 103.692,34.169 103.692,37.931 103.532,38.091 103.332,38.091 v1(103.283,38.14)
I2C_SCL1: D8.6 IC26.6 IC43.1 J9.27 | length 26.1
  TopLayer w0.125: J9.27@138.774,17.254 140.003,16.025 144.275,16.025 145.375,17.125 147.8,17.125 148.3,17.625 149.413,17.625 D8.6@149.488,17.7 149.488,16.965 149.095,16.572 149.095,12.364 149.022,12.291 149.022,11.959 149.095,11.886 149.095,9.58 v1(151.175,7.5) 151.19,7.515 IC26.6@152.698,7.515
  BottomLayer w0.254: IC43.1@149.925,7.175 150.175,7.175 150.348,7.348 150.348,7.351 150.497,7.5 v1(151.175,7.5)
I2C_SDA1: D8.4 IC26.5 IC43.3 J9.26 | length 30
  TopLayer w0.125: J9.26@141.314,19.794 143.804,19.794 145.094,18.504 148.04,18.504 148.17,18.373 148.673,18.373 149,18.7 D8.4@149.488,18.7 149.653,18.7 149.741,18.788 149.741,18.8 149.842,18.902 v1@149.842,19.23 ; v1(149.825,16.625) 149.825,9.725 151.45,8.1 153.473,8.1 153.775,7.798 153.775,6.852 153.41,6.488 153.41,6.482 153.21,6.282 152.935,6.282 IC26.5@152.698,6.045
  TopLayer w0.254: v1(151.225,6.225) 152.05,6.201 152.05,6.192 IC26.5@152.698,6.245
  MidLayer2 w0.125: v1(149.825,16.625) 149.848,16.648 v1(149.848,19.236)
  BottomLayer w0.254: IC43.3@150.154,5.102 149.981,5.275 IC43.3@149.925,5.275 150.725,5.275 151.225,5.775 v1(151.225,6.225)
IN_SEL: IC1.32 R79.1 SW1.3 | length 13.8
  TopLayer w0.125: IC1.32@87.248,80.75 88.868,80.75 95.425,74.193 96.713,74.193 SW1.3@96.739,74.219 96.916,74.041 98.133,74.041 R79.1@98.234,73.939
JTAG_TCK: IC15.5 IC15.6 IC16.4 | length 63.9
  TopLayer w0.114: IC15.5@124.398,25.475 125.848,25.475 125.986,25.613 ; IC15.6@124.398,26.125 124.455,26.068 125.53,26.068 125.986,25.613 ; IC16.4@149.923,51 149.923,50.1 150.961,49.063 151.81,49.063 152.623,48.25 152.623,38.659 153.55,37.732 153.55,24.025 149.596,20.071 145.977,20.071 144.798,21.25 130.348,21.25 125.986,25.613
JTAG_TDO: IC16.9 IC18.4 | length 76.5
  TopLayer w0.125: v2(127.848,25.875) 135.848,25.875 138.098,23.625 143.273,23.625 145.873,21.025 149.523,21.025 151.498,23 151.498,30.45 151.675,30.627 151.675,31.848 150.818,32.705 150.818,44.438 151.173,44.793 151.173,46.7 149.673,48.2 148.645,48.2 147.347,49.499 144.95,51.895 144.95,53.675 145.55,54.275 150.498,54.275 152.361,56.138 152.361,56.738 IC16.9@152.523,56.9
  BottomLayer w0.125: IC18.4@122.323,25.825 122.598,25.825 122.736,25.963 122.736,25.988 123.548,26.8 125.448,26.8 126.373,25.875 v2(127.848,25.875)
JTAG_TMS: IC15.3 IC15.4 IC16.7 | length 64.4
  TopLayer w0.114: IC15.3@124.398,24.175 126.298,24.175 126.578,24.455 ; IC15.4@124.398,24.825 124.566,24.657 125.151,24.657 125.158,24.65 126.382,24.65 126.578,24.455 ; IC16.7@151.873,51 152.041,50.832 152.041,50.207 152.173,50.075 152.848,50.075 153.023,49.9 153.023,39.602 153.924,38.701 153.924,35.31 153.9,35.286 153.9,23.8 149.7,19.6 148.3,19.6 147.979,19.279 146.203,19.279 144.582,20.9 130.132,20.9 126.578,24.455
LED0: IC10.26 IC37.9 R45.2 T3.1 | length 82
  TopLayer w0.125: v2(21.9,33.2) 34.975,33.2 51.7,16.475 62.823,16.475 68.098,21.75 85.036,21.75 85.261,21.525 IC10.26@86.248,21.525 IC10.26@86.298,21.575
  BottomLayer w0.125: T3.1@17.398,27.65 R45.2@19.016,27.65 ; R45.2@18.998,27.65 18.998,30.298 v2(21.9,33.2)
LED1: IC10.27 IC37.10 R227.2 T19.1 | length 74.6
  TopLayer w0.125: v2(30.025,21.175) 38.65,21.175 39.6,22.125 43.875,22.125 45.7,20.3 46.8,20.3 51.025,16.075 63.048,16.075 68.248,21.275 84.861,21.275 85.261,20.875 IC10.27@86.248,20.875
  BottomLayer w0.125: T19.1@17.398,22.65 18.518,22.65 18.75,22.417 18.75,22.397 18.978,22.17 R227.2@18.998,22.17 ; R227.2@19.043,22.125 24.05,22.125 25,21.175 v2(30.025,21.175)
LED_ERR: IC10.28 IC37.11 R255.2 T21.1 | length 95.1
  TopLayer w0.125: v2(28.772,20.63) 43.795,20.63 48.774,15.651 63.324,15.651 68.323,20.65 83.55,20.65 84.623,20.65 85.048,20.225 IC10.28@86.248,20.225
  BottomLayer w0.125: T21.1@0.7,7.925 0.714,7.939 2.025,7.939 7.064,7.939 19.755,20.63 v2(28.772,20.63)
LVDS_DUAL_N0: IC27.4 J8.3 R161.2 | length 13
  BottomLayer w0.085: IC27.4@153.148,47.7 153.323,47.7 153.405,47.783 153.405,47.794 153.455,47.844 154.065,47.844 155.494,47.844 156.677,49.027 158.668,49.027 158.718,48.977 158.718,48.907 J8.3@157.848,48.037 ; J8.3@157.558,47.747 J8.3@157.848,48.037 ; R161.2@162.21,48.95 161.963,49.197 161.963,49.294 161.913,49.344 161.05,49.344 160.496,48.79 158.958,48.79 158.205,48.037 J8.3@157.848,48.037
LVDS_DUAL_N1: IC27.8 J8.6 R162.2 | length 14.4
  BottomLayer w0.085: IC27.8@153.148,45.7 153.323,45.7 153.405,45.782 153.405,45.794 153.455,45.844 153.575,45.844 154.025,45.844 156.069,43.8 158.625,43.8 159.024,44.199 159.024,44.65 159.291,44.917 159.808,44.917 J8.6@160.098,45.207 159.808,45.497 159.303,45.497 159.025,45.775 159.025,46.138 159.2,46.313 160.826,46.313 161.375,46.862 161.375,47.069 161.65,47.344 161.913,47.344 161.963,47.294 161.963,47.197 R162.2@162.21,46.95
LVDS_DUAL_N2: IC28.4 J8.9 R163.2 | length 12.3
  BottomLayer w0.085: IC28.4@153.148,41.2 153.323,41.2 153.405,41.283 153.405,41.294 153.455,41.344 158.033,41.344 158.605,41.344 158.655,41.294 158.655,41.224 J8.9@157.848,40.417 ; J8.9@157.558,40.127 J8.9@157.848,40.417 ; R163.2@162.21,41.2 161.963,41.447 161.963,41.544 161.913,41.594 161,41.594 160.631,41.225 159.05,41.225 158.242,40.417 J8.9@157.848,40.417
LVDS_DUAL_N3: IC28.8 J8.12 R164.2 | length 14.8
  BottomLayer w0.085: IC28.8@153.148,39.2 153.323,39.2 153.405,39.282 153.405,39.294 153.455,39.344 153.881,39.344 155.85,37.375 155.85,37.125 156.725,36.25 158.45,36.25 158.934,36.734 158.934,37.537 158.984,37.587 J8.12@159.463,37.587 ; J8.12@160.098,37.587 159.838,37.587 J8.12@159.463,37.587 ; R164.2@162.21,39.2 161.963,39.447 161.963,39.544 161.913,39.594 161.494,39.594 160.688,38.788 158.95,38.788 158.9,38.738 158.9,38.15 159.22,37.83 159.398,37.83 159.463,37.765 J8.12@159.463,37.587
LVDS_DUAL_N4: IC29.4 J8.15 R167.2 | length 12.9
  BottomLayer w0.085: IC29.4@153.148,34.7 153.323,34.7 153.405,34.783 153.405,34.794 153.455,34.844 154.125,34.844 154.213,34.931 155.563,34.931 155.875,34.619 156.647,33.847 156.709,33.785 156.797,33.785 158.201,33.785 158.204,33.787 158.668,33.787 158.718,33.737 158.718,33.667 J8.15@157.842,32.791 ; J8.15@157.558,32.507 157.787,32.736 J8.15@157.842,32.791 ; R167.2@162.21,33.45 161.963,33.697 161.963,33.794 161.913,33.844 161.225,33.844 161.006,33.625 159.1,33.625 158.341,32.866 158.327,32.866 158.252,32.791 J8.15@157.842,32.791
LVDS_DUAL_P0: IC27.3 J8.2 R145.2 | length 12.8
  BottomLayer w0.085: IC27.3@153.148,48.2 153.323,48.2 153.405,48.118 153.405,48.106 153.455,48.056 154.153,48.056 155.406,48.056 156.589,49.239 158.756,49.239 158.868,49.127 158.938,49.127 ; 158.939,49.127 159.462,49.623 ccw(c159.2,49.9) 159.478,49.639 159.928,50.117 159.978,50.167 160.048,50.167 160.098,50.117 160.098,49.949 159.27,49.122 159.27,49.051 159.32,49.002 160.408,49.002 160.962,49.556 161.913,49.556 161.963,49.606 161.963,49.703 R145.2@162.21,49.95
LVDS_DUAL_P1: IC27.7 J8.5 R146.2 | length 14.8
  BottomLayer w0.085: IC27.7@153.148,46.2 153.323,46.2 153.405,46.117 153.405,46.106 153.455,46.056 153.663,46.056 154.113,46.056 156.157,44.012 158.537,44.012 158.812,44.287 158.812,44.65 158.436,45.026 157.739,45.026 J8.5@157.558,45.207 157.749,45.398 158.436,45.398 158.813,45.775 158.813,46.226 159.112,46.525 160.738,46.525 161.163,46.95 161.163,47.157 161.562,47.556 161.913,47.556 161.963,47.606 161.963,47.703 R146.2@162.21,47.95
LVDS_DUAL_P2: IC28.3 J8.8 R147.2 | length 12.2
  BottomLayer w0.085: IC28.3@153.148,41.7 153.323,41.7 153.405,41.618 153.405,41.606 153.455,41.556 157.945,41.556 158.693,41.556 158.742,41.507 158.938,41.507 J8.8@160.098,42.667 160.098,42.323 159.625,41.85 159.385,41.61 159.385,41.54 159.488,41.437 160.543,41.437 160.912,41.806 161.913,41.806 161.963,41.856 161.963,41.953 R147.2@162.21,42.2
LVDS_DUAL_P3: IC28.7 J8.11 R148.2 | length 14.8
  BottomLayer w0.085: IC28.7@153.148,39.7 153.323,39.7 153.405,39.618 153.405,39.606 153.455,39.556 153.969,39.556 156.062,37.463 156.062,37.213 156.813,36.462 158.362,36.462 158.722,36.822 158.722,37.537 158.672,37.587 J8.11@158.162,37.587 ; J8.11@157.558,37.587 157.75,37.587 J8.11@158.162,37.587 ; R148.2@162.21,40.2 161.963,39.953 161.963,39.856 161.913,39.806 161.406,39.806 160.6,39 158.862,39 158.688,38.826 158.688,38.113 158.431,37.856 158.258,37.856 158.162,37.76 J8.11@158.162,37.587
LVDS_DUAL_P4: IC29.3 J8.14 R149.2 | length 12.7
  BottomLayer w0.085: IC29.3@153.148,35.2 153.323,35.2 153.405,35.118 153.405,35.106 153.455,35.056 154.037,35.056 154.125,35.144 155.65,35.144 156.797,33.997 158.114,33.997 158.116,33.999 158.756,33.999 158.868,33.887 158.938,33.887 J8.14@160.098,35.047 160.098,34.702 159.353,33.957 159.353,33.887 159.403,33.837 160.918,33.837 161.137,34.056 161.913,34.056 161.963,34.106 161.963,34.203 R149.2@162.21,34.45
LVDS_JTAG_TCK_N: IC29.14 IC30.8 | length 42
  MidLayer2 w0.11: v1(135.597,55.602) 135.619,55.579 135.87,55.579 136.674,54.775 142.875,54.775 145.887,51.763 148.337,51.763 151.35,48.75 152.375,48.75 152.975,48.15 152.975,39.335 149.395,35.755 149.395,35.087 149.395,34.975 149.164,34.744 v2(149.164,34.716)
  BottomLayer w0.085: v1(135.597,55.602) 135.606,55.592 135.874,55.592 136.488,54.979 136.488,54.237 136.942,53.783 136.942,53.294 136.723,53.075 IC30.8@136.723,52.55 ; v2(149.164,34.716) 149.164,34.708 149.408,34.464 149.408,33.831 149.895,33.344 150.541,33.344 150.59,33.294 150.59,33.282 150.673,33.2 IC29.14@150.848,33.2
LVDS_JTAG_TCK_P: IC29.15 IC30.7 | length 41.9
  MidLayer2 w0.11: v1(136.086,55.949) 136.109,55.926 136.109,55.675 136.772,55.012 142.973,55.012 145.985,52 148.435,52 151.448,48.987 152.473,48.987 153.212,48.248 153.212,39.237 149.632,35.657 149.632,35.185 149.632,34.959 149.864,34.728 v2(149.864,34.7)
  BottomLayer w0.085: v1(136.086,55.949) 136.096,55.939 136.096,55.671 136.7,55.066 136.7,54.325 137.154,53.871 137.154,53.294 137.373,53.075 IC30.7@137.373,52.55 ; v2(149.864,34.7) 149.855,34.7 149.62,34.464 149.62,33.919 149.982,33.556 150.541,33.556 150.59,33.606 150.59,33.618 150.673,33.7 IC29.15@150.848,33.7
LVDS_JTAG_TDI_N: IC27.12 IC30.1 | length 18.9
  MidLayer2 w0.11: v1(141.318,54.05) 141.087,53.819 141.087,53.188 141.363,52.913 142.738,52.913 144.325,51.325 146.548,51.325 149.287,48.586 149.287,48.3 149.937,47.65 150.773,47.65 151.087,47.336 151.087,45.781 150.634,45.327 150.432,45.327 150.201,45.096 v2(150.173,45.096)
  BottomLayer w0.085: IC30.1@141.273,52.55 141.273,53.075 141.054,53.294 141.054,53.428 141.074,53.448 141.074,53.806 v1(141.318,54.05) ; v2(150.173,45.096) 150.173,45.113 150.4,45.34 150.541,45.34 150.59,45.29 150.59,45.283 150.673,45.2 IC27.12@150.848,45.2
LVDS_JTAG_TDI_P: IC27.13 IC30.2 | length 18.5
  MidLayer2 w0.11: v1(140.618,54.05) 140.85,53.819 140.85,53.09 141.264,52.676 142.639,52.676 144.227,51.088 146.45,51.088 149.05,48.488 149.05,48.202 149.839,47.413 150.675,47.413 150.85,47.238 150.85,45.879 150.535,45.564 150.44,45.564 150.208,45.796 v2(150.18,45.796)
  BottomLayer w0.085: v1(140.618,54.05) 140.862,53.806 140.862,53.536 140.842,53.515 140.842,53.294 140.623,53.075 IC30.2@140.623,52.55 ; v2(150.18,45.796) 150.18,45.771 150.4,45.552 150.537,45.552 150.59,45.606 150.59,45.618 150.673,45.7 IC27.13@150.848,45.7
LVDS_JTAG_TDO_N: IC27.14 IC31.8 | length 24.9
  TopLayer w0.085: IC31.8@148.343,29.4 148.343,28.925 148.6,28.668 148.822,28.668 148.872,28.618 148.872,28.347 148.6,28.075 147.275,28.075 146.625,28.725 146.625,35.2 147.825,36.4 147.825,41.7 148.75,42.625 148.75,46.288 148.85,46.388 149.193,46.388 149.329,46.388 v2(149.573,46.144)
  BottomLayer w0.085: v2(149.573,46.144) 149.817,46.388 150.206,46.388 150.251,46.344 150.541,46.344 150.59,46.294 150.59,46.282 150.673,46.2 IC27.14@150.848,46.2
LVDS_JTAG_TDO_P: IC27.15 IC31.7 | length 26
  TopLayer w0.085: v2(149.573,46.844) 149.329,46.6 149.106,46.6 148.762,46.6 148.538,46.376 148.538,42.713 147.613,41.788 147.613,36.488 146.413,35.288 146.413,28.637 147.125,27.925 147.187,27.863 148.688,27.863 149.084,28.259 149.084,28.618 149.134,28.668 149.356,28.668 149.613,28.925 IC31.7@149.613,29.4
  BottomLayer w0.085: v2(149.573,46.844) 149.817,46.6 150.294,46.6 150.339,46.556 150.541,46.556 150.59,46.606 150.59,46.618 150.673,46.7 IC27.15@150.848,46.7
LVDS_JTAG_TMS_N: IC28.14 IC30.5 | length 26.2
  MidLayer2 w0.11: v1(138.648,53.85) 138.648,53.822 138.467,53.641 138.467,52.296 138.913,51.85 139.53,51.85 140.273,51.107 140.273,49.614 140.799,49.088 142.587,49.088 143.45,48.225 143.45,45 144.813,43.637 148.423,43.637 150.837,41.223 150.837,40.222 150.402,39.787 150.157,39.787 149.926,39.556 v2(149.898,39.556)
  BottomLayer w0.085: v1(138.648,53.85) 138.648,53.845 138.454,53.651 138.454,53.492 138.454,53.294 138.673,53.075 IC30.5@138.673,52.55 ; v2(149.898,39.556) 149.898,39.572 150.17,39.844 150.529,39.844 150.673,39.7 IC28.14@150.848,39.7
LVDS_JTAG_TMS_P: IC28.15 IC30.6 | length 25.7
  MidLayer2 w0.11: v1(138.048,53.85) 138.048,53.822 138.23,53.641 138.23,52.198 138.814,51.613 139.432,51.613 140.036,51.009 140.036,49.516 140.701,48.851 142.489,48.851 143.213,48.127 143.213,44.902 144.715,43.4 148.325,43.4 150.6,41.125 150.6,40.32 150.304,40.024 150.157,40.024 149.926,40.256 v2(149.898,40.256)
  BottomLayer w0.085: IC30.6@138.023,52.55 138.023,53.075 138.242,53.294 138.242,53.58 138.242,53.651 138.048,53.845 v1(138.048,53.85) ; v2(149.898,40.256) 149.956,40.256 150.155,40.056 150.529,40.056 150.673,40.2 IC28.15@150.848,40.2
LVDS_JTAG_TRSTn_N: IC28.12 IC30.4 | length 29.9
  MidLayer2 w0.11: v1(139.343,53.875) 139.343,53.847 139.525,53.666 139.525,53.181 ; 139.524,53.181 139.524,52.777 140.363,51.938 142.027,51.938 144.5,49.465 144.5,46.066 146.079,44.487 148.563,44.487 151.275,41.775 151.275,39.525 149.825,38.075 148.675,38.075 148.475,38.275 148.475,38.776 148.575,38.876 148.718,38.876 148.814,38.876 149.045,38.644 v2(149.073,38.644)
  BottomLayer w0.085: IC30.4@139.323,52.55 139.323,53.075 139.542,53.294 139.542,53.428 139.537,53.432 139.537,53.676 139.343,53.87 v1(139.343,53.875) ; v2(149.073,38.644) 149.317,38.888 150.485,38.888 150.673,38.7 IC28.12@150.848,38.7
LVDS_JTAG_TRSTn_P: IC28.13 IC30.3 | length 31
  MidLayer2 w0.11: 139.761,53.083 139.761,52.875 140.461,52.175 142.125,52.175 144.737,49.563 144.737,46.164 146.177,44.724 148.661,44.724 151.512,41.873 151.512,39.427 149.923,37.838 148.577,37.838 148.238,38.177 148.238,38.874 148.477,39.113 148.619,39.113 148.814,39.113 149.045,39.344 v2(149.073,39.344) ; 139.762,53.083 139.762,53.666 139.943,53.847 v1(139.943,53.875)
  BottomLayer w0.085: v1(139.943,53.875) 139.943,53.87 139.749,53.676 139.749,53.52 139.754,53.515 139.754,53.294 139.973,53.075 IC30.3@139.973,52.55 ; v2(149.073,39.344) 149.317,39.101 150.541,39.101 150.558,39.118 150.766,39.118 IC28.13@150.848,39.2
MGT_RX0_N: C53.2 IC4.A8 | length 29.2
  TopLayer w0.085: v1(96.498,65.45) IC4.A8@96.998,64.95
  BottomLayer w0.085: C53.2@75.625,79.575 75.65,79.575 75.832,79.393 75.832,79.359 75.849,79.343 75.849,79.237 75.899,79.187 77.588,79.187 79.282,77.494 85.931,77.494 88.063,75.362 88.063,74.937 88.425,74.575 96.112,66.888 96.112,65.322 96.378,65.056 96.448,65.056 96.498,65.106 v1(96.498,65.45)
MGT_RX0_P: C52.2 IC4.B8 | length 29.2
  TopLayer w0.085: v1(96.498,64.45) IC4.B8@96.998,63.95
  BottomLayer w0.085: C52.2@75.625,78.6 75.65,78.6 75.832,78.782 75.832,78.807 75.861,78.836 75.861,78.925 75.911,78.975 77.5,78.975 79.194,77.282 85.844,77.282 87.85,75.275 87.85,74.85 88.275,74.425 88.425,74.275 95.9,66.8 95.9,65.234 96.29,64.844 96.448,64.844 96.498,64.794 v1(96.498,64.45)
MGT_RX1_N: C55.2 IC4.C11 | length 38.4
  TopLayer w0.085: C55.2@70.9,75.875 70.925,75.875 71.107,76.057 71.107,76.194 71.157,76.244 71.228,76.244 72.237,76.244 72.287,76.294 72.562,76.294 72.688,76.169 72.688,76.091 72.398,75.801 v2(72.375,75.801) ; v1(99.498,63.45) IC4.C11@99.998,62.95
  SignalLayer1 w0.11: v2(72.375,75.801) 72.479,75.801 72.675,75.997 72.675,76.3 72.937,76.562 76.963,76.562 80.95,72.575 82.255,72.575 88.518,66.312 98.673,66.312 99.12,65.865 99.12,63.291 99.342,63.069 99.434,63.069 99.498,63.133 v1(99.498,63.45)
MGT_RX1_P: C54.2 IC4.D11 | length 38.5
  TopLayer w0.085: C54.2@70.9,76.825 70.925,76.825 71.107,76.643 71.107,76.506 71.157,76.456 71.316,76.456 72.15,76.456 72.199,76.506 72.65,76.506 72.725,76.431 72.9,76.257 72.9,76.064 73.163,75.801 v2(73.275,75.801) ; v1(99.498,62.45) IC4.D11@99.998,61.95
  SignalLayer1 w0.11: v2(73.275,75.801) 73.2,75.876 73.033,75.876 72.912,75.997 72.912,76.202 73.035,76.325 76.865,76.325 80.852,72.338 82.157,72.338 88.42,66.075 98.575,66.075 98.883,65.767 98.883,63.193 99.244,62.832 99.434,62.832 99.498,62.767 v1(99.498,62.45)
MGT_RX2_N: C57.1 IC41.8 | length 2.2
  BottomLayer w0.085: C57.1@49.725,64.525 50.09,64.89 50.09,65.053 50.287,65.25 50.844,65.25 50.844,65.397 50.844,65.518 50.794,65.568 50.782,65.568 50.7,65.65 IC41.8@50.7,65.825
MGT_RX2_P: C56.1 IC41.7 | length 2.1
  BottomLayer w0.085: C56.1@50.675,64.532 50.675,64.557 50.325,64.907 50.325,64.988 50.375,65.038 50.932,65.038 51.056,65.162 51.056,65.31 51.056,65.518 51.106,65.568 51.117,65.568 51.2,65.65 IC41.7@51.2,65.825
MGT_RX3_N: C59.1 IC36.4 | length 2
  BottomLayer w0.085: IC36.4@100.248,72.05 100.248,71.875 100.33,71.793 100.342,71.793 100.392,71.743 100.392,71.485 100.825,71.052 100.825,70.875 100.425,70.475 C59.1@100.425,70.45
MGT_RX3_P: C58.1 IC36.3 | length 2
  BottomLayer w0.085: IC36.3@100.748,72.05 100.748,71.875 100.665,71.793 100.654,71.793 100.604,71.743 100.604,71.572 101.037,71.139 101.037,70.813 101.375,70.475 C58.1@101.375,70.45
MGT_RXC2_N: C57.2 IC4.A10 | length 71.4
  TopLayer w0.085: v1(98.498,65.45) IC4.A10@98.998,64.95
  SignalLayer1 w0.11: v2(49.75,62.8) 50.081,63.131 50.081,65.555 49.738,65.897 49.738,73.073 52.252,75.587 52.802,75.587 55.652,78.437 60.302,78.437 60.463,78.598 60.463,79.388 60.869,79.794 64.241,79.794 64.426,79.609 65.216,79.609 65.888,78.937 65.888,78.921 66.323,78.486 68.814,78.486 72.058,75.242 75.033,75.242 78.85,71.425 80.885,71.425 84.037,68.273 84.037,67.698 86.667,65.069 98.434,65.069 98.498,65.133 v1(98.498,65.45)
  BottomLayer w0.085: C57.2@49.725,63.825 49.725,63.8 49.907,63.618 49.977,63.618 50.094,63.5 50.094,63.144 v2(49.75,62.8)
MGT_RXC2_P: C56.2 IC4.B10 | length 71.4
  TopLayer w0.085: v1(98.498,64.45) IC4.B10@98.998,63.95
  SignalLayer1 w0.11: v2(50.65,62.8) 50.318,63.132 50.318,63.5 50.318,63.865 cw(c50.473,63.865) 50.473,64.02 50.492,64.02 ccw(c50.492,64.175) 50.647,64.175 ccw(c50.492,64.175) 50.492,64.33 50.473,64.33 cw(c50.473,64.485) 50.318,64.485 50.318,64.707 50.318,65.653 49.975,65.995 49.975,72.975 52.35,75.35 52.9,75.35 55.75,78.2 60.4,78.2 60.7,78.5 60.7,79.29 60.968,79.557 64.143,79.557 64.328,79.372 65.118,79.372 65.651,78.839 65.651,78.823 66.225,78.249 68.716,78.249 71.96,75.005 74.935,75.005 78.752,71.188 80.787,71.188 83.8,68.175 83.8,67.6 86.568,64.832 98.434,64.832 98.498,64.767 v1(98.498,64.45)
  BottomLayer w0.085: v2(50.65,62.8) 50.306,63.144 50.306,63.5 50.43,63.624 50.493,63.624 50.675,63.807 C56.2@50.675,63.832